# Altium PCB Stepper-Driver-v2.0.PcbDoc (part 4 of 7)
Units mil, origin at the board's own origin, x right, y up, seen from the top; angles counter-clockwise.
Board outline 5905.51 x 4330.71 mil, 4 copper layers (Top Layer, Layer 1, Layer 2, Bottom Layer), stack 62.047 mil thick; 312 components, 285 nets, 1093 pads, 969 vias.
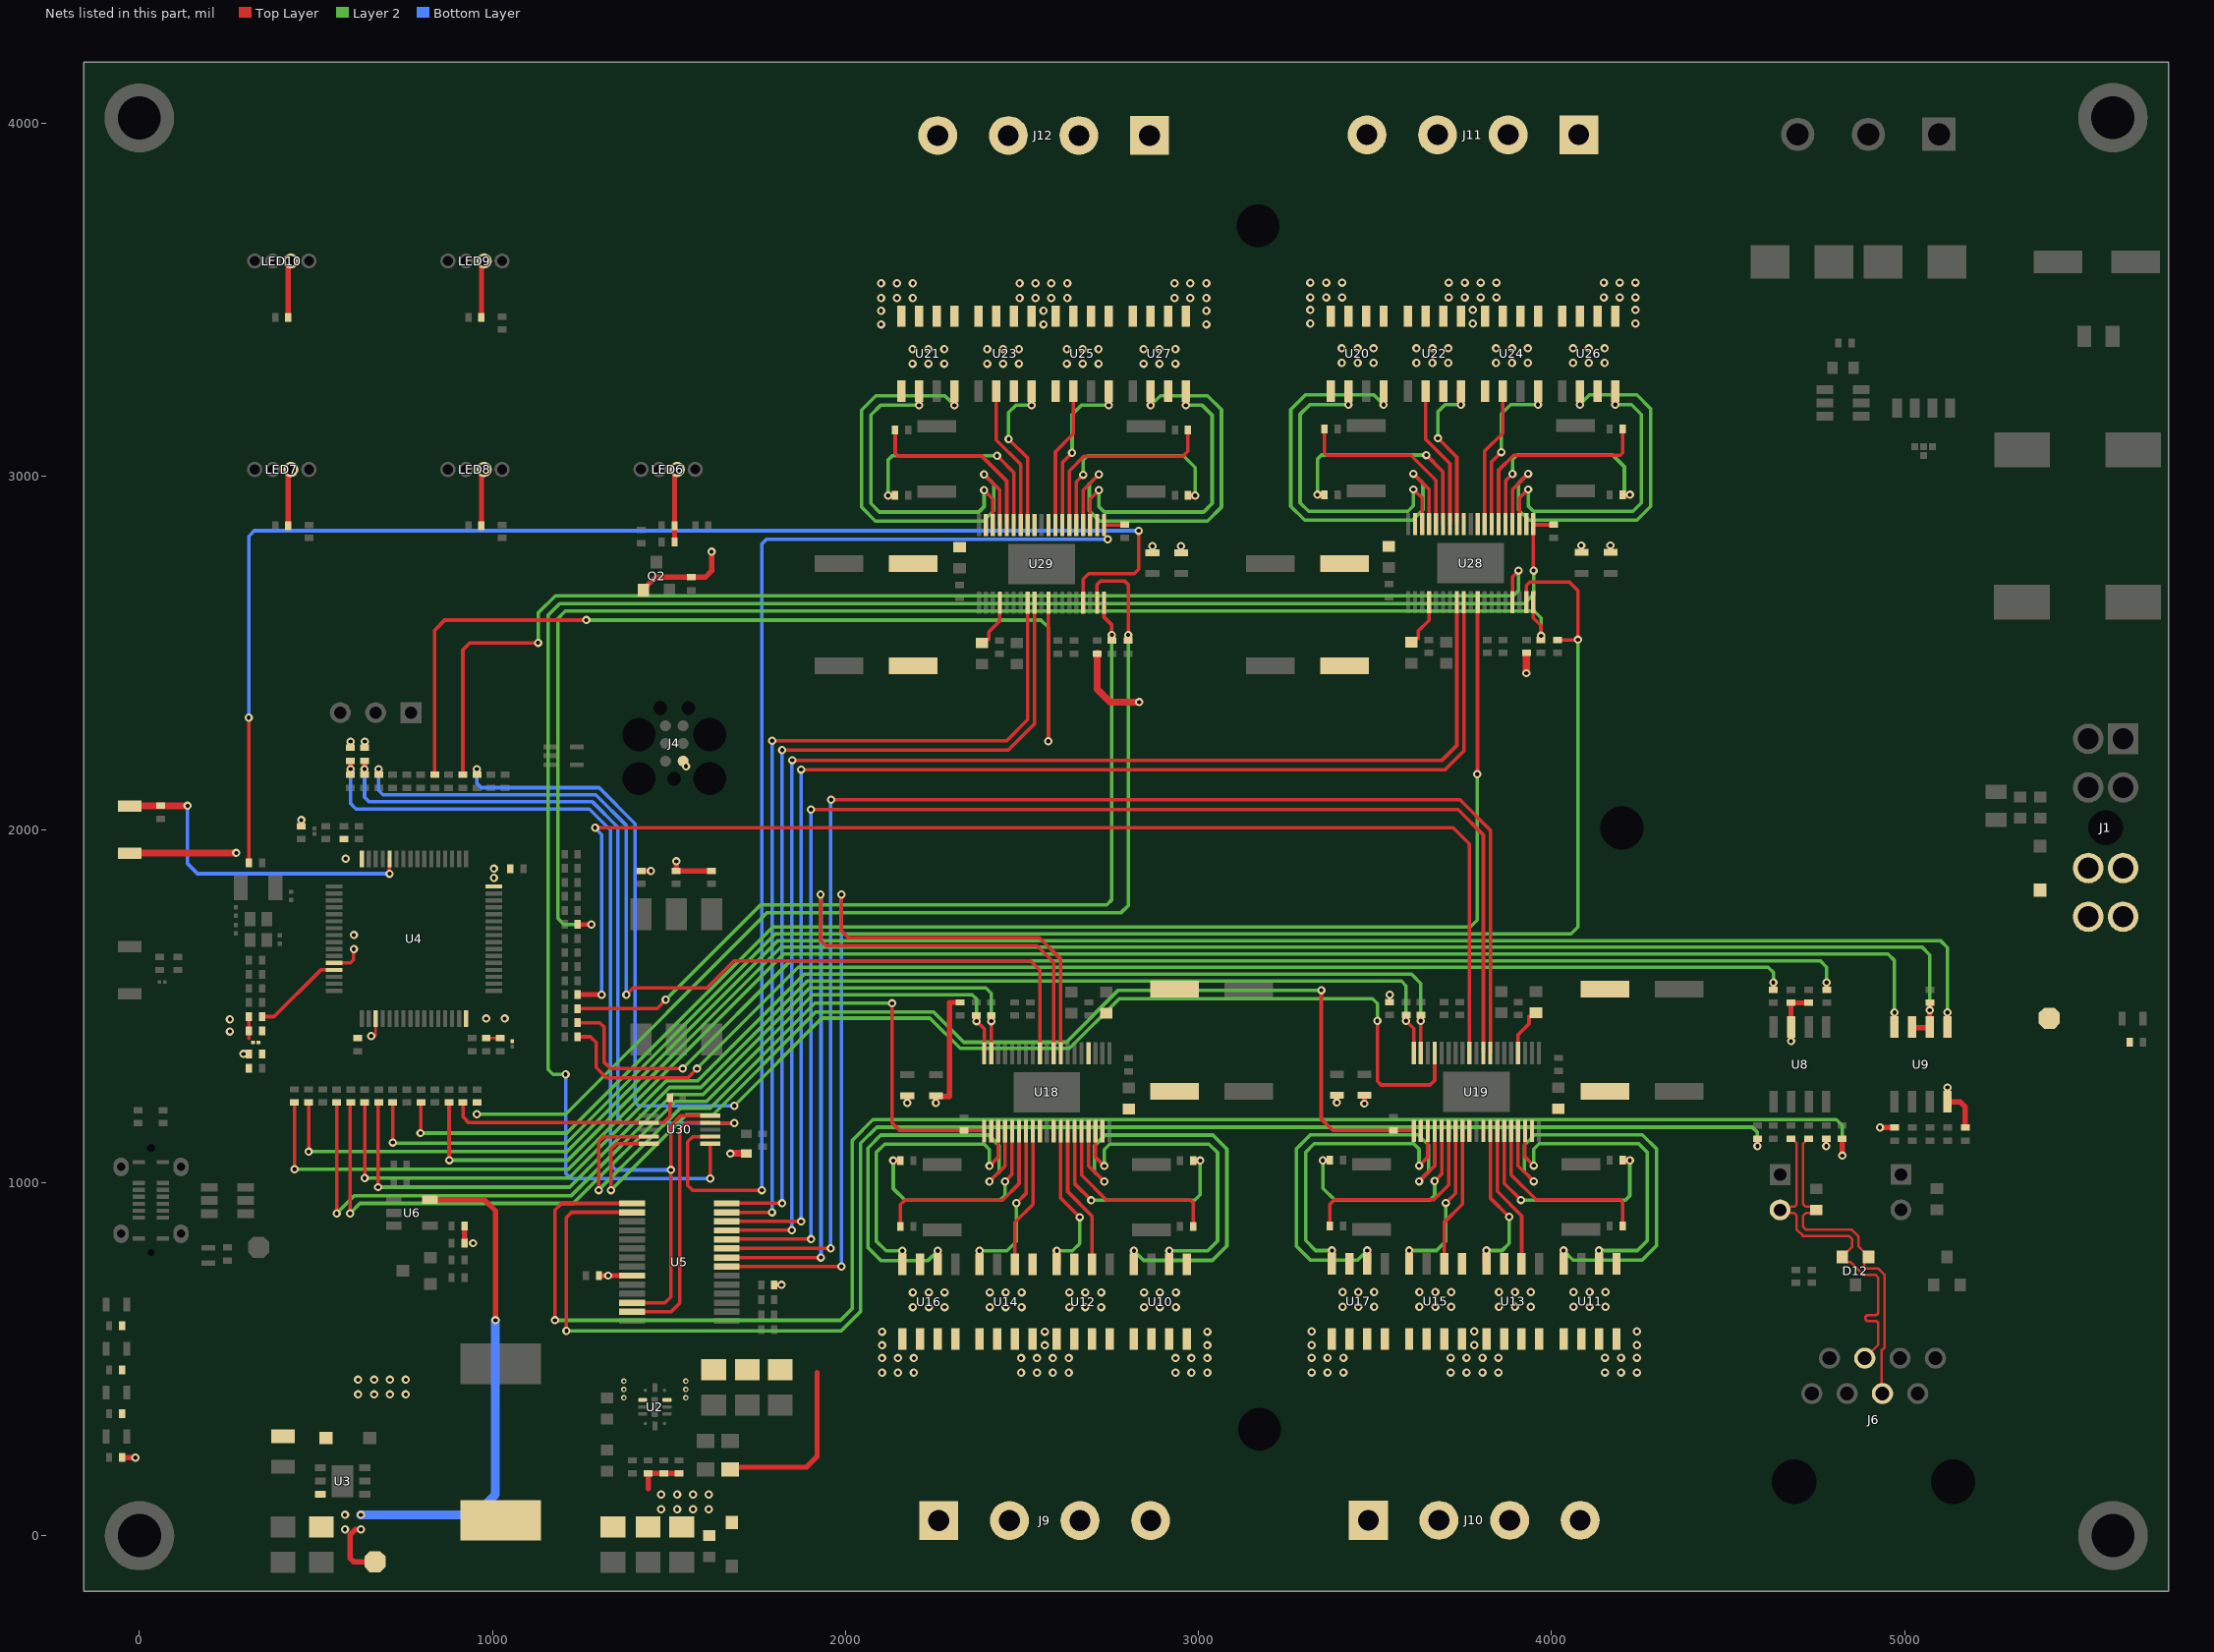
[diagram p4: the nets of this part, all layers, seen from the top]

## Via types
v1: diameter 23.62, hole 11.81, Top Layer to Bottom Layer, tented both sides, 945 vias
v2: diameter 15.75, hole 7.87, Top Layer to Bottom Layer, 24 vias

## Nets (pads, with @x,y where several pads share a name; then routed paths per layer and width w, separated by ;. In a path a pad name is that pad's centre, name@x,y a point inside that pad or via, vN(x,y) a via of type N, cw(c..) or ccw(c..) an arc to the next point about the centre after c; other vN are vias at no path point) (continued)
A2HS-3: (continued)
  Top Layer w22: v1(3742.66,3203.92) U22.4@3742.66,3241.62
  Layer 2 w10: v1(3677.81,3108.63) 3677.81,3183.52 3698.21,3203.92 v1(3742.66,3203.92)
A2HS-4: U23.4 U29.31 | length 451.8
  Top Layer w10: v1(2461.83,3106.49) 2515.53,3052.79 U29.31@2515.53,2862.77
  Top Layer w22: v1(2526.68,3201.77) U23.4@2526.68,3239.47
  Layer 2 w10: v1(2461.83,3106.49) 2461.83,3181.38 2482.22,3201.77 v1(2526.68,3201.77)
A2LS-1: U12.2 U18.32 | length 405.4
  Top Layer w10: U18.32@2629.04,1145.91 2629.04,974.44 2698.21,905.27 U12.2@2698.21,769.21
A2LS-2: U13.2 U19.32 | length 405.4
  Top Layer w10: U19.32@3845.89,1146.77 3845.89,975.3 3915.05,906.13 U13.2@3915.05,770.07
A2LS-3: U22.2 U28.32 | length 405.4
  Top Layer w10: U22.2@3642.66,3241.62 3642.66,3105.56 3711.83,3036.39 U28.32@3711.83,2864.92
A2LS-4: U23.2 U29.32 | length 405.4
  Top Layer w10: U23.2@2426.68,3239.47 2426.68,3103.42 2495.85,3034.25 U29.32@2495.85,2862.77
ADC_SCL: R33.1 R71.2 U5.12 U30.10 | length 2737.3
  Top Layer w10: U5.12@1395.47,659.91 1488.71,659.91 1505.11,676.32 v1(1505.11,1036.04) 1505.11,1162 1532.46,1189.35 1615.86,1189.35 U30.10@1615.94,1189.44
  Top Layer w15: v1(597.68,2171.5) R71.2@597.68,2194.81
  Bottom Layer w10: v1(597.68,2171.5) 597.68,2073.95 613.11,2058.52 1273.88,2058.52 1333.71,1998.69 1333.71,1051.57 1349.24,1036.04 v1(1505.11,1036.04)
ADC_SDA: R31.1 R70.2 U5.13 U30.9 | length 2815.3
  Top Layer w10: U5.13@1395.47,634.32 1506.05,634.32 1530.7,658.96 1530.7,1151.53 1548.92,1169.75 U30.9@1615.94,1169.75 1616.37,1169.33 v1@1684.54,1169.33
  Top Layer w15: v1(637.44,2171.5) 637.64,2171.7 637.64,2194.61 R70.2@637.84,2194.81
  Bottom Layer w10: v1(637.44,2171.5) 637.44,2091.65 650.57,2078.52 1283.05,2078.52 1354.84,2006.73 1354.84,1182.05 1367.98,1168.91 v1(1684.54,1168.91)
AGND: C29.1 C30.1 D8.1 R12.2 U4.12 | length 151.9
  Top Layer w10: 310.11,1408.02 C29.1@310.11,1429.72 C30.1@310.12,1470.22 ; U4.12@550.83,1622.26 597.71,1622.26 606.16,1630.72 v1@606.16,1661.57
  other v1: 255.99,1428.22 255.99,1462.47 607.16,1661.57 607.16,1701.41
AISENN-1: NT3.1 U18.33 | length 643.6
  Top Layer w10: U18.33@2648.73,1145.91 2648.73,997.06 v1(2695.88,949.91)
  Top Layer w20: NT3.1@2988.23,1062.43 v1(3004.54,1062.43)
  Layer 2 w10: v1(2695.88,949.91) 2988.46,949.91 3004.54,965.99 v1(3004.54,1062.43)
AISENN-2: NT4.1 U19.33 | length 646.1
  Top Layer w10: U19.33@3865.58,1146.77 3865.58,997.92 v1(3912.72,950.77)
  Top Layer w20: NT4.1@4205.07,1063.29 v1(4221.38,1063.29)
  Layer 2 w10: v1(3912.72,950.77) 4209.6,950.77 4221.38,962.55 v1(4221.38,1063.29)
AISENN-3: NT11.1 U28.33 | length 646.1
  Top Layer w10: v1(3645,3060.92) 3692.14,3013.77 U28.33@3692.14,2864.92
  Top Layer w20: v1(3336.34,2948.4) NT11.1@3352.65,2948.4
  Layer 2 w10: v1(3336.34,2948.4) 3336.34,3049.14 3348.11,3060.92 v1(3645,3060.92)
AISENN-4: NT12.1 U29.33 | length 646.1
  Top Layer w10: v1(2429.02,3058.77) 2476.16,3011.63 U29.33@2476.16,2862.77
  Top Layer w20: v1(2120.36,2946.25) NT12.1@2136.67,2946.25
  Layer 2 w10: v1(2120.36,2946.25) 2120.36,3047 2132.13,3058.77 v1(2429.02,3058.77)
AISENP-1: NT1.1 U18.34 | length 539.7
  Top Layer w10: U18.34@2668.41,1145.91 2668.42,1021.39 2739.19,950.62 2977,950.62 2984.38,943.24 NT1.1@2984.38,876.39
AISENP-2: NT2.1 U19.34 | length 539.7
  Top Layer w10: U19.34@3885.27,1146.77 3885.27,1022.25 3956.04,951.48 4193.84,951.48 4201.22,944.1 NT2.1@4201.22,877.25
AISENP-3: NT9.1 U28.34 | length 539.7
  Top Layer w10: NT9.1@3356.5,3134.44 3356.5,3067.59 3363.88,3060.21 3601.68,3060.21 3672.45,2989.44 U28.34@3672.46,2864.92
AISENP-4: NT10.1 U29.34 | length 539.7
  Top Layer w10: NT10.1@2140.51,3132.29 2140.51,3065.45 2147.89,3058.07 2385.7,3058.07 2456.47,2987.3 U29.34@2456.48,2862.77
AOUT1-1: J9.4 U10.1 U10.5 U10.6 U18.37
  other v1: 2845.38,647.57 2890.38,647.57 2935.38,647.57 2845.38,689.21 2890.38,689.21 2935.38,689.21
AOUT1-2: J10.4 U11.1 U11.5 U11.6 U19.37
  other v1: 4062.22,648.43 4107.22,648.43 4152.22,648.43 4062.22,690.07 4107.22,690.07 4152.22,690.07
AOUT1-3: J11.4 U20.1 U20.5 U20.6 U28.37
  other v1: 3405.5,3321.62 3450.5,3321.62 3495.5,3321.62 3405.5,3363.26 3450.5,3363.26 3495.5,3363.26
AOUT1-4: J12.4 U21.1 U21.5 U21.6 U29.37
  other v1: 2189.51,3319.48 2234.51,3319.48 2279.51,3319.48 2189.51,3361.12 2234.51,3361.12 2279.51,3361.12
AOUT2-1: J9.3 U12.3 U12.7 U12.8 U18.30
  other v1: 2633.92,647.57 2678.92,647.57 2723.92,647.57 2633.92,689.21 2678.92,689.21 2723.92,689.21
AOUT2-2: J10.3 U13.3 U13.7 U13.8 U19.30
  other v1: 3850.76,648.43 3895.76,648.43 3940.76,648.43 3850.76,690.07 3895.76,690.07 3940.76,690.07
AOUT2-3: J11.3 U22.3 U22.7 U22.8 U28.30
  other v1: 3616.96,3321.62 3661.96,3321.62 3706.96,3321.62 3616.96,3363.26 3661.96,3363.26 3706.96,3363.26
AOUT2-4: J12.3 U23.3 U23.7 U23.8 U29.30
  other v1: 2400.97,3319.48 2445.97,3319.48 2490.97,3319.48 2400.97,3361.12 2445.97,3361.12 2490.97,3361.12
AVDD: C29.2 C30.2 D8.2 R11.1 U4.13 | length 258.5
  Top Layer w10: C30.2@347.12,1470.22 381.06,1470.22 513.42,1602.58 U4.13@550.83,1602.58
B1HS-1: U14.2 U18.27 | length 397.9
  Top Layer w10: U14.2@2479.55,769.21 2479.55,887.56 2530.62,938.64 U18.27@2530.62,1145.91
B1HS-2: U15.2 U19.27 | length 397.9
  Top Layer w10: U15.2@3696.39,770.07 3696.39,888.42 3747.47,939.49 U19.27@3747.47,1146.77
B1HS-3: U24.2 U28.27 | length 397.9
  Top Layer w10: U28.27@3810.25,2864.92 3810.25,3072.19 3861.33,3123.27 U24.2@3861.33,3241.62
B1HS-4: U25.2 U29.27 | length 397.9
  Top Layer w10: U29.27@2594.27,2862.77 2594.27,3070.05 2645.35,3121.13 U25.2@2645.35,3239.47
B1LS-1: U14.4 U18.26 | length 476.6
  Top Layer w10: v1(2483.35,941.64) 2510.93,969.22 U18.26@2510.93,1145.91
  Top Layer w22: U14.4@2379.53,770.27 v1@2379.53,807.97
  Layer 2 w10: v1(2379.55,806.91) 2457.17,806.91 2483.35,833.09 v1(2483.35,941.64)
B1LS-2: U15.4 U19.26 | length 476.6
  Top Layer w10: v1(3700.19,942.49) 3727.78,970.08 U19.26@3727.78,1146.77
  Top Layer w22: U15.4@3596.39,770.07 v1(3596.39,807.77)
  Layer 2 w10: v1(3596.39,807.77) 3674.01,807.77 3700.19,833.96 v1(3700.19,942.49)
B1LS-3: U24.4 U28.26 | length 438.9
  Top Layer w10: U28.26@3829.94,2864.92 3829.94,3041.61 v1(3857.53,3069.19)
  Layer 2 w10: v1(3857.53,3069.19) 3857.53,3177.73 3883.71,3203.92 v1(3961.33,3203.92)
B1LS-4: U25.4 U29.26 | length 476.6
  Top Layer w10: U29.26@2613.96,2862.77 2613.96,3039.47 v1(2641.55,3067.05)
  Top Layer w22: v1@2745.37,3200.72 U25.4@2745.37,3238.42
  Layer 2 w10: v1(2641.55,3067.05) 2641.55,3175.59 2667.73,3201.77 v1(2745.35,3201.77)
B2HS-1: U16.4 U18.22 | length 866.7
  Top Layer w10: v1(2407.46,1047.3) 2432.19,1072.04 U18.22@2432.19,1145.91
  Top Layer w22: U16.4@2160.88,769.21 v1(2160.88,806.91)
  Layer 2 w10: v1(2160.88,806.91) 2114.59,806.91 2086.49,835 2086.49,1085.2 2110.49,1109.2 2392.24,1109.2 2407.47,1093.98 v1@2407.47,1047.3
B2HS-2: U17.4 U19.22 | length 866.7
  Top Layer w10: v1(3624.3,1048.16) 3649.04,1072.89 U19.22@3649.04,1146.77
  Top Layer w22: U17.4@3377.72,770.07 v1(3377.72,807.77)
  Layer 2 w10: v1(3377.72,807.77) 3331.43,807.77 3303.33,835.87 3303.33,1086.07 3327.33,1110.07 3609.08,1110.07 3624.3,1094.84 v1(3624.3,1048.16)
B2HS-3: U26.4 U28.22 | length 866.7
  Top Layer w10: U28.22@3908.68,2864.92 3908.68,2938.79 v1(3933.41,2963.53)
  Top Layer w22: v1(4180,3203.92) U26.4@4180,3241.62
  Layer 2 w10: v1(3933.41,2963.53) 3933.41,2916.84 3948.64,2901.62 4230.39,2901.62 4254.39,2925.62 4254.39,3175.82 4226.29,3203.92 v1(4180,3203.92)
B2HS-4: U27.4 U29.22 | length 866.7
  Top Layer w10: U29.22@2692.7,2862.77 2692.7,2936.65 v1(2717.43,2961.38)
  Top Layer w22: v1(2964.01,3201.77) U27.4@2964.01,3239.47
  Layer 2 w10: v1(2717.43,2961.38) 2717.43,2914.7 2732.65,2899.48 3014.4,2899.48 3038.4,2923.48 3038.4,3173.68 3010.31,3201.77 v1(2964.01,3201.77)
B2LS-1: U16.2 U18.23 | length 1216.6
  Top Layer w10: v1(2407.46,1002.89) 2451.87,1047.3 U18.23@2451.88,1145.91
  Top Layer w22: U16.2@2260.88,769.21 v1(2260.88,806.91)
  Layer 2 w10: v1(2260.88,806.91) 2233.6,779.62 2099.56,779.62 2063.32,815.87 2063.32,1098.28 2099.65,1134.61 2405.2,1134.61 2434.49,1105.32 2434.49,1029.92 ; v1@2407.47,1002.89 2433.96,1029.38
B2LS-2: U17.2 U19.23 | length 1219.3
  Top Layer w10: v1(3624.3,1003.75) 3668.72,1048.16 U19.23@3668.73,1146.77
  Top Layer w22: U17.2@3477.72,770.07 v1(3477.72,807.77)
  Layer 2 w10: v1(3477.72,807.77) 3450.43,780.48 3316.4,780.48 3276.91,819.98 3276.91,1095.9 3316.48,1135.47 3622.04,1135.47 3651.33,1106.18 3651.33,1030.78 ; v1(3624.3,1003.75) 3650.8,1030.25
B2LS-3: U26.2 U28.23 | length 1219.3
  Top Layer w10: U28.23@3888.99,2864.92 3889,2963.53 v1(3933.41,3007.94)
  Top Layer w22: v1(4080,3203.92) U26.2@4080,3241.62
  Layer 2 w10: 3906.39,2980.91 3906.39,2905.51 3935.68,2876.21 4241.23,2876.21 4280.81,2915.79 4280.81,3191.71 4241.31,3231.2 4107.28,3231.2 v1(4080,3203.92) ; 3906.92,2981.44 v1(3933.41,3007.94)
B2LS-4: U27.2 U29.23 | length 1219.3
  Top Layer w10: U29.23@2673.01,2862.77 2673.02,2961.38 v1(2717.43,3005.8)
  Top Layer w22: v1(2864.01,3201.77) U27.2@2864.01,3239.47
  Layer 2 w10: 2690.4,2978.77 2690.4,2903.37 2719.7,2874.07 3025.25,2874.07 3064.83,2913.65 3064.83,3189.57 3025.33,3229.06 2891.3,3229.06 v1(2864.01,3201.77) ; 2690.94,2979.3 v1(2717.43,3005.8)
BEMF-1: C60.1 U18.20 U30.4 | length 1931
  Top Layer w10: v1(1300.33,978.7) 1300.33,1115.53 1315.18,1130.38 U30.4@1442.72,1130.38 ; 2131.56,1492.04 2131.56,1169.28 2153.42,1147.41 C60.1@2334.88,1147.41 2391.92,1147.41 2392.82,1146.51 U18.20@2392.82,1145.91
  Layer 2 w10: v1@1300.12,978.91 1428.82,1107.61 1532.44,1211.23 1616.32,1211.23 1913.13,1508.04 v1@2132.49,1508.04
  other v1: 2131.56,1508.04
BEMF-2: C61.1 U19.20 U30.5 | length 3181
  Top Layer w10: v1@1335.72,986.71 1335.72,1096.01 1350.4,1110.7 U30.5@1442.72,1110.7 ; v1(3347.31,1545.07) 3347.31,1180.72 3379.76,1148.27 C61.1@3551.72,1148.27 3608.76,1148.27 3609.67,1147.37 U19.20@3609.67,1146.77
  Layer 2 w10: v1@1335.6,978.82 1549.07,1192.3 1624.66,1192.3 1916.23,1483.87 2248.45,1483.87 2334.44,1397.88 2625.36,1397.88 2772.54,1545.07 v1(3347.31,1545.07)
  other v1: 1335.72,978.7
BEMF-3: C76.1 U28.20 U30.6 | length 5208.8
  Top Layer w10: U30.6@1615.94,1110.7 1616.37,1110.27 v1(1616.37,1011.4) ; U28.20@3948.05,2864.92 3948.34,2864.62 3948.34,2733.86 v1(3948.64,2733.57) ; U28.20@3948.96,2863.42 C76.1@4006,2863.42
  Layer 2 w10: v1(1206.93,1306.32) 1171.53,1306.32 1157.27,1320.58 1157.27,2607.13 1190.2,2640.07 3923.01,2640.07 3948.64,2665.7 v1(3948.64,2733.57)
  Bottom Layer w10: v1(1206.93,1306.32) 1206.93,1027.28 1222.8,1011.4 v1(1616.37,1011.4)
BEMF-4: C77.1 U29.20 U30.7 | length 3282.9
  Top Layer w10: U30.7@1615.94,1130.38 1567.54,1130.38 1552.73,1115.57 1552.73,992.05 1566.08,978.7 v1(1762.63,978.7) ; U29.20@2732.98,2861.87 U29.20@2732.07,2862.77 C77.1@2789.38,2862.77 ; v1@2745.33,2822.55 v1@2745.33,2822.86
  Bottom Layer w10: v1(1762.63,978.7) 1762.63,2809.23 1775.95,2822.55 v1(2742.33,2822.55)
BEMF-ADC-RDY: R21.1 R129.2 U30.2 | length 693.5
  Top Layer w10: R21.1@916.17,1227.01 916.17,1186.22 932.64,1169.75 U30.2@1442.72,1169.75 1484.6,1169.75 1501.98,1187.14 R129.2@1501.98,1240.07
BISENN-1: NT7.1 U18.24 | length 621.8
  Top Layer w10: v1(2451.88,1003.5) 2471.56,1023.18 U18.24@2471.56,1145.91
  Top Layer w20: v1(2134.92,1062.43) NT7.1@2151.23,1062.43
  Layer 2 w10: v1(2134.92,1062.43) 2134.93,983.25 2168.27,949.91 2437.2,949.91 2451.88,964.59 v1(2451.88,1003.5)
BISENN-2: NT8.1 U19.24 | length 606.7
  Top Layer w10: v1(3668.73,1004.36) 3688.41,1024.04 U19.24@3688.41,1146.77
  Layer 2 w10: v1(3351.76,1063.29) 3351.76,984.11 3385.11,950.77 3656.09,950.77 3668.73,963.41 v1(3668.73,1004.36)
BISENN-3: NT15.1 U28.24 | length 619.6
  Top Layer w10: U28.24@3869.31,2864.92 3869.31,2987.65 v1(3888.99,3007.32)
  Top Layer w20: NT15.1@4208.43,2948.4 v1(4221.38,2948.4)
  Layer 2 w10: v1(3888.99,3007.32) 3888.99,3048.28 3901.63,3060.92 4172.61,3060.92 4205.95,3027.57 4205.95,2948.4
BISENN-4: NT16.1 U29.24 | length 623
  Top Layer w10: U29.24@2653.33,2862.77 2653.33,2985.5 v1(2673.01,3005.18)
  Top Layer w20: NT16.1@2973.66,2946.25 v1(2989.97,2946.25)
  Layer 2 w10: v1(2673.01,3005.18) 2673.01,3046.13 2685.65,3058.77 2956.63,3058.77 2989.97,3025.43 v1(2989.97,2946.25)
BISENP-1: NT5.1 U18.25 | length 570.8
  Top Layer w10: NT5.1@2155.08,876.39 2155.08,937.52 2168.23,950.68 2444.84,950.68 2491.24,997.08 U18.25@2491.25,1145.91
BISENP-2: NT6.1 U19.25 | length 573.3
  Top Layer w10: NT6.1@3371.92,877.25 3371.92,938.38 3385.07,951.53 3666,951.53 3708.09,993.62 U19.25@3708.1,1146.77
BISENP-3: NT13.1 U28.25 | length 592.5
  Top Layer w10: U28.25@3849.62,2864.92 3849.63,3018.06 3891.72,3060.15 4194.45,3060.15 4201.22,3066.92 NT13.1@4201.22,3134.44
BISENP-4: NT14.1 U29.25 | length 573.3
  Top Layer w10: U29.25@2633.64,2862.77 2633.65,3015.92 2675.74,3058.01 2956.66,3058.01 2969.81,3071.16 NT14.1@2969.81,3132.29
BOOT0: R69.2 SW3.1 U4.60 | length 954.6
  Top Layer w10: v1(708.33,1875.07) U4.60@708.31,1917.54
  Top Layer w20: SW3.1@-27.96,2067.41 v1(136.17,2067.41)
  Bottom Layer w10: v1(136.17,2067.41) 136.17,1903.22 164.33,1875.07 v1(708.33,1875.07)
BOUT1-1: J9.2 U14.1 U14.5 U14.6 U18.28
  other v1: 2408.44,647.57 2453.44,647.57 2498.44,647.57 2408.44,689.21 2453.44,689.21 2498.44,689.21
BOUT1-2: J10.2 U15.1 U15.5 U15.6 U19.28
  other v1: 3625.28,648.43 3670.28,648.43 3715.28,648.43 3625.28,690.07 3670.28,690.07 3715.28,690.07
BOUT1-3: J11.2 U24.1 U24.5 U24.6 U28.28
  other v1: 3842.44,3321.62 3887.44,3321.62 3932.44,3321.62 3842.44,3363.26 3887.44,3363.26 3932.44,3363.26
BOUT1-4: J12.2 U25.1 U25.5 U25.6 U29.28
  other v1: 2626.45,3319.48 2671.45,3319.48 2716.45,3319.48 2626.45,3361.12 2671.45,3361.12 2716.45,3361.12
BOUT2-1: J9.1 U16.3 U16.7 U16.8 U18.21
  other v1: 2190.67,647.57 2235.67,647.57 2280.67,647.57 2190.67,689.21 2235.67,689.21 2280.67,689.21
BOUT2-2: J10.1 U17.3 U17.7 U17.8 U19.21
  other v1: 3407.51,648.43 3452.51,648.43 3497.51,648.43 3407.51,690.07 3452.51,690.07 3497.51,690.07
BOUT2-3: J11.1 U26.3 U26.7 U26.8 U28.21
  other v1: 4060.21,3321.62 4105.21,3321.62 4150.21,3321.62 4060.21,3363.26 4105.21,3363.26 4150.21,3363.26
BOUT2-4: J12.1 U27.3 U27.7 U27.8 U29.21
  other v1: 2844.23,3319.48 2889.23,3319.48 2934.23,3319.48 2844.23,3361.12 2889.23,3361.12 2934.23,3361.12
CAN1_N: D12.2 J6.5 J7.2 R90.2 | length 984.8
  Top Layer w7: R90.2@4677.95,1124.23 4683.45,1118.73 4687.01,1118.73 4694.47,1111.28 4694.47,938.93 4687.29,931.76 4665.97,931.76 4656.95,922.73 4665.93,913.76 4687.14,913.76 4693.64,907.25 4693.64,867.87 4712.19,849.32 4841.51,849.32 4851.29,839.54 4851.29,818.59 4836.75,804.05 4835.53,804.05 4822.89,791.4 4822.89,787.47 4835.53,774.83 4847,774.83 4882.52,739.31 4916.63,739.31 4925.44,730.49 4925.44,653.98 4925.44,633.48 cw(c4916.94,633.48) 4916.94,624.98 4896.6,624.98 ccw(c4896.6,616.48) 4896.6,607.98 4916.94,607.98 cw(c4916.94,599.48) 4925.44,599.48 4925.44,581.62 4925.44,541.23 J6.5@4886.95,502.74
CAN1_P: D12.1 J6.4 R85.2 R91.2 | length 989.2
  Top Layer w7: R85.2@4727.95,1124.23 4724.45,1124.23 4718.95,1118.73 4718.95,1117.4 4712.47,1110.91 4712.47,938.95 4719.66,931.76 4739.83,931.76 R91.2@4749.33,922.26 4740.83,913.76 4719.65,913.76 4711.64,905.75 4711.64,875.32 4719.65,867.32 4848.97,867.32 4869.29,846.99 4869.29,819.15 4884.39,804.05 4885.05,804.05 4897.69,791.4 D12.1@4897.69,788.81 ; D12.1@4897.69,786.84 4885.88,775.03 4885.88,761.41 4889.98,757.31 4924.09,757.31 4943.44,737.95 4943.44,533.77 4935.16,525.49 4935.16,404.53 J6.4@4936.95,402.74
CAN1_RXD: R40.1 R89.1 | length 3660.7
  Top Layer w8: R89.1@4627.95,1546.23 R89.1@4627.99,1546.28
  Top Layer w10: R40.1@1241.36,1413.21 1277.18,1413.21 1293.33,1397.06 1293.33,1326.11 1322.33,1297.1 1553.49,1297.1 v1(1579.33,1322.95)
  Top Layer w15: R89.1@4627.99,1546.28 v1(4627.99,1566.9)
  Layer 2 w10: v1(1579.33,1322.95) 1866.06,1609.68 4613.51,1609.68 4627.99,1595.2 v1(4627.99,1566.9)
CAN1_SHDN: R92.1 U5.2 | length 4470.6
  Top Layer w8: R92.1@4582.95,1124.23 R92.1@4582.95,1124.23
  Top Layer w10: v1(1209.33,580.07) 1209.33,901.3 1224.17,916.13 1395.15,916.13 U5.2@1395.47,915.81
  Top Layer w15: v1(4582.91,1103.57) R92.1@4582.95,1124.23
  Layer 2 w10: v1(1209.33,580.07) 1987.4,580.07 2042.51,635.18 2042.51,1111.34 2088.29,1157.12 4567.9,1157.12 4582.91,1142.11 v1(4582.91,1103.57)
CAN1_STB: R83.1 U5.1 | length 4840.6
  Top Layer w8: R83.1@4822.94,1124.23 R83.1@4822.94,1124.23
  Top Layer w10: v1(1176.54,610.07) 1176.54,922.46 1195.48,941.4 U5.1@1395.47,941.4
  Top Layer w15: R83.1@4822.94,1124.23 4822.9,1113.9 4822.9,1077.14 v1(4823.45,1076.6)
  Layer 2 w10: v1(1176.54,610.07) 1985.5,610.07 2019.33,643.9 2019.33,1120.44 2077.47,1178.58 4806.44,1178.58 4823.45,1161.58 v1(4823.45,1076.6)
CAN1_TXD: R42.1 R84.1 | length 3847.9
  Top Layer w8: R84.1@4778.95,1546.23 R84.1@4778.99,1546.28
  Top Layer w10: R42.1@1241.36,1452.97 1303.35,1452.97 1316.44,1439.88 1316.44,1340.76 1334.25,1322.95 v1(1538.62,1322.95)
  Top Layer w15: R84.1@4778.99,1546.28 v1(4778.99,1566.9)
  Layer 2 w10: v1(1538.62,1322.95) 1844.35,1628.68 4760.66,1628.68 4778.99,1610.34 v1(4778.99,1566.9)
DI_PA3: R22.2 R109.2 U18.18 | length 2624.6
  Top Layer w10: v1(558.3,913.07) R22.2@558.3,1227.01 ; U18.18@2412.51,1366.39 2412.59,1366.46 R109.2@2412.59,1473.47
  Layer 2 w10: v1(558.3,913.07) 589.47,944.23 607.54,962.31 1222.11,962.31 1509.15,1249.35 1596.4,1249.35 1898.41,1551.35 2397.12,1551.35 2412.53,1535.94 v1(2412.53,1457.36)
DI_PA4: R24.2 R111.2 U18.19 | length 2513.4
  Top Layer w10: v1(596.33,913.07) 596.33,1225.27 R24.2@598.07,1227.01 ; v1(2370.75,1457.36) 2392.82,1435.29 U18.19@2392.82,1366.39
  Layer 2 w10: v1(596.33,913.07) 624.43,941.16 1228.62,941.16 1517.9,1230.44 1605.95,1230.44 1907.67,1532.16 2358.81,1532.16 2370.75,1520.22 v1(2370.75,1457.36)
DI_PA5: R26.2 R110.2 U19.18 | length 3668.4
  Top Layer w10: v1(637.81,1013.19) R26.2@637.83,1227.01 ; U19.18@3629.36,1367.24 3629.43,1367.32 3629.43,1474.33 R110.2@3629.51,1474.4
  Layer 2 w10: v1(637.81,1013.19) 1216.57,1013.19 1491.81,1288.43 1581.26,1288.43 1883.17,1590.34 3603.11,1590.34 3629.38,1564.07 v1(3629.38,1458.22)
DI_PA6: R28.2 R112.2 U19.19 | length 3593.7
  Top Layer w10: v1@675.96,992.19 675.96,1225.38 R28.2@677.59,1227.01 ; v1(3587.59,1458.22) 3609.67,1436.14 U19.19@3609.67,1367.24
  Layer 2 w10: v1(675.96,987.19) 1218.34,987.19 1500.95,1269.8 1590.4,1269.8 1891.3,1570.7 3574.42,1570.7 3587.59,1557.54 v1(3587.59,1458.22)
DI_PA7: R30.2 R123.2 U28.18 | length 4947.5
  Top Layer w10: v1(717.33,1113.56) R30.2@717.36,1227.01 ; U28.18@3928.36,2640.07 3928.29,2639.99 3928.29,2691.46 3937.99,2701.17 4050.3,2701.17 4074.48,2676.99 v1(4074.48,2537.7) 4074.27,2537.49 4016.64,2537.49 R123.2@4016.43,2537.28
  Layer 2 w10: v1(717.33,1113.56) 718.83,1112.07 1208.44,1112.07 1801.06,1704.68 4054.74,1704.68 4074.48,1724.42 v1(4074.48,2537.7)
DI_PA8: R32.2 R125.2 U28.19 | length 3943.6
  Top Layer w10: U28.19@3948.05,2642.3 3948.05,2599.47 3970.13,2577.39 v1(3970.13,2549.09)
  Top Layer w13.21: R32.2@1241.66,1731.42 v1@1279.69,1731.42
  Layer 2 w10: v1(1279.79,1731.32) 1202.1,1731.32 1184.7,1748.72 1184.7,2597.63 1206.14,2619.07 3950.33,2619.07 3970.13,2599.27 v1@3970.13,2549.78
DI_PB10: R36.1 R124.2 U29.18 | length 3155.5
  Top Layer w10: U29.18@2712.38,2642.3 2712.31,2642.23 2712.31,2693.7 2722.01,2703.41 2790.74,2703.41 2800.58,2693.57 v1(2800.58,2551.33) ; R124.2@2792.95,2539.14 2796.95,2535.14 R124.2@2800.45,2535.14
  Layer 2 w10: v1(955.81,1193.83) 1207.02,1193.83 1778.2,1765.01 2780.93,1765.01 2800.58,1784.66 v1(2800.58,2551.33)
DI_PB14: R44.1 R126.2 U29.19 | length 2502
  Top Layer w10: R44.1@1241.36,1492.74 1242.02,1493.4 1465.89,1493.4 v1(1490.48,1518) ; U29.19@2732.07,2644.54 2732.07,2601.7 2754.14,2579.63 v1(2754.14,2551.33) ; R126.2@2746.51,2539.14 2750.51,2535.14 R126.2@2754.02,2535.14
  Layer 2 w10: v1(1490.48,1518) 1759.47,1786.99 2739.57,1786.99 2754.14,1801.57 v1(2754.14,2551.33)
DIR-1: R29.1 U18.11 | length 2740.3
  Top Layer w10: v1(1379.08,1532.25) 1398.28,1551.45 1606.54,1551.45 1683.24,1628.15 2524.11,1628.15 2550.24,1602.01 2550.24,1366.45 U18.11@2550.3,1366.39
  Bottom Layer w10: v1(677.2,2171.5) 677.2,2110.72 689.4,2098.52 1291.87,2098.52 1379.08,2011.31 v1(1379.08,1532.25)
DIR-2: R46.1 U19.11 | length 3636.1
  Top Layer w10: v1(1290.33,2005.07) 3721.38,2005.07 3767.15,1959.3 U19.11@3767.15,1367.24
  Top Layer w13.21: R46.1@1241.66,1532.47 v1@1309.33,1532.47
  Bottom Layer w10: v1(1290.33,2005.07) 1309.33,1986.07 v1(1309.33,1532.37)
DIR-3: R53.2 U28.11 | length 4231.4
  Top Layer w10: v1(796.01,1140.31) 796.44,1140.75 796.44,1226.57 R53.2@796.88,1227.01 ; v1(3789.33,2157.07) 3789.95,2157.69 3789.95,2643.82 U28.11@3790.57,2644.44
  Layer 2 w10: v1(796.01,1140.31) 1209.82,1140.31 1794.08,1724.57 3769.96,1724.57 3789.33,1743.94 v1(3789.33,2157.07)
DIR-4: R50.1 U29.11 | length 2883
  Top Layer w10: R50.1@836.26,2155.31 836.26,2565.21 864.38,2593.34 v1(1265.31,2593.34) ; v1(2573.82,2250.07) 2574.21,2250.45 2574.21,2641.92 U29.11@2574.59,2642.3
  Layer 2 w10: v1(1265.31,2593.34) 2553.45,2593.34 2573.82,2572.96 v1(2573.82,2250.07)
DO_PB1: R19.1 R97.1 U9.2 U9.3 | length 4899.8
  Top Layer w8: R97.1@5071.25,1509.23 R97.1@5071.25,1509.23
  Top Layer w10: R19.1@876.41,1227.01 876.85,1226.57 876.85,1059.16 v1@877.28,1058.73 ; R97.1@5071.25,1509.23 R97.1@5071.25,1511.57
  Top Layer w15: U9.3@5021.25,1441.44 5023.6,1439.08 5068.89,1439.08 U9.2@5071.25,1441.44 ; U9.2@5071.25,1441.44 v1(5071.2,1488.57) ; v1(5071.2,1488.57) 5071.2,1498.9 R97.1@5071.25,1509.23
  Layer 2 w10: v1(877.28,1063.73) 1213.85,1063.73 1816.8,1666.68 5049.48,1666.68 5071.2,1644.95 v1(5071.2,1488.57)
DO_PC10: R58.2 U19.16 | length 4103.1
  Top Layer w10: v1(3506.24,1458.22) 3506.24,1287.37 3516.92,1276.69 3655.58,1276.69 3668.73,1289.84 U19.16@3668.73,1367.24
  Layer 2 w10: v1(1684.54,1217.85) 1932.72,1466.04 2239.03,1466.04 2325,1380.07 2634.33,1380.07 2775.18,1520.92 3492.72,1520.92 3506.24,1507.39 v1(3506.24,1458.22)
  Bottom Layer w10: v1(955.67,2171.5) 955.67,2131.29 968.31,2118.66 1301.74,2118.66 1403.54,2016.86 1403.54,1228.48 1414.17,1217.85 v1(1684.54,1217.85)
DO_PC11: R59.2 U28.16 | length 3616.1
  Top Layer w10: R59.2@915.79,2155.31 915.79,2509.01 935.84,2529.07 v1(1128.92,2529.07) ; U28.16@3888.99,2644.44 3888.99,2716.17 v1(3906.39,2733.57)
  Layer 2 w10: v1(1128.92,2529.07) 1128.92,2613.25 1178.24,2662.57 3891.99,2662.57 3906.39,2676.96 v1(3906.39,2733.57)
DO_PC13: R62.2 U29.16 | length 3791
  Top Layer w10: v1@309.84,2317.07 309.84,1905.8 R62.2@310.34,1905.3 ; U29.16@2673.01,2642.3 2673.01,2709.8 2688.21,2724.99 2817.6,2724.99 2830.06,2737.45 v1@2830.06,2839.55
  Bottom Layer w10: v1(309.33,2317.07) 309.33,2830.74 325.14,2846.55 v1(2830.06,2846.55)
EXP_DO_PA0: U5.21 U18.8 | length 2402.6
  Top Layer w10: U5.21@1663.19,762.27 v1(1988.21,762.27) ; v1(1988.21,1816.14) 1988.21,1713.67 2008.23,1693.64 2548.88,1693.64 2609.36,1633.15 U18.8@2609.36,1366.39
  Bottom Layer w10: v1(1988.21,762.27) v1(1988.21,1816.14)
EXP_DO_PA1: U5.22 U18.9 | length 2369.4
  Top Layer w10: U5.22@1663.19,787.86 v1(1930.33,787.86) ; v1(1929.03,1816.14) 1929.03,1686.73 1944.9,1670.86 2542.42,1670.86 2589.67,1623.61 U18.9@2589.67,1366.39
  Bottom Layer w10: v1(1929.03,1816.14) 1930.33,1814.84 v1(1930.33,787.86)
EXP_DO_PA2: U5.23 U19.8 | length 4098.9
  Top Layer w10: U5.23@1663.74,814 v1(1957.93,814) ; v1(1959.29,2084.44) 3740.13,2084.44 3826.27,1998.3 3826.27,1367.31 U19.8@3826.21,1367.24
  Bottom Layer w10: v1(1957.93,814) 1957.93,2083.08 v1(1959.29,2084.44)
EXP_DO_PA3: U5.24 U19.9 | length 4007.6
  Top Layer w10: U5.24@1663.19,839.04 1663.96,839.82 v1(1902.29,839.82) ; v1(1901.68,2056.45) 3734.99,2056.45 3806.52,1984.93 U19.9@3806.52,1367.24
  Bottom Layer w10: v1(1902.29,839.82) v1@1902.29,2055.84
EXP_DO_PA4: U5.25 U28.8 | length 3822.7
  Top Layer w10: U5.25@1663.19,864.63 1664.18,865.63 v1(1847.49,865.63) ; v1@1848.42,2196.44 v1(1849.34,2196.44) 3689.43,2196.44 3731.51,2238.52 U28.8@3731.51,2644.44
  Bottom Layer w10: v1(1847.49,865.63) 1847.49,2194.6 v1(1849.34,2196.44)
EXP_DO_PA5: U5.26 U28.9 | length 3810.2
  Top Layer w10: U5.26@1663.42,889.99 v1(1873.78,889.99) ; v1@1874.33,2169.93 3698.22,2169.93 3751.2,2222.91 U28.9@3751.2,2644.44
  Bottom Layer w10: v1(1873.78,889.99) v1@1873.78,2169.52
  other v1: 1874.33,2170.07
EXP_DO_PA6: U5.27 U29.8 | length 2543.9
  Top Layer w10: U5.27@1663.19,915.81 1663.3,915.92 v1@1791.54,915.92 ; v1@1792.01,2251.18 2455.45,2251.18 2515.53,2311.27 U29.8@2515.53,2642.3
  Bottom Layer w10: v1(1791.38,916.03) 1791.7,916.35 1791.7,2251.51 v1(1792.01,2251.83)
EXP_DO_PA7: U5.28 U29.9 | length 2529.5
  Top Layer w10: U5.28@1663.19,941.4 1663.63,941.85 v1@1820.33,941.85 ; v1(1820.22,2224.98) 2460.7,2225.06 2535.22,2299.58 U29.9@2535.22,2642.3
  Bottom Layer w10: v1(1820.22,2224.98) 1820.28,2224.93 v1(1820.33,941.4) v1(1820.33,941.4)